# Altium PCB Zotino-DIOT.PCBDOC (part 2 of 11)
Units mil, origin at the board's own origin, x right, y up, seen from the top; angles counter-clockwise.
Board outline 8771.61 x 3949.04 mil, 4 copper layers (TopLayer, Internal Plane 2, Signal Layer 1, BottomLayer), stack 61.54 mil thick; 915 components, 534 nets, 3073 pads, 1180 vias.
Unrouted connection lines stored in the file: 36.
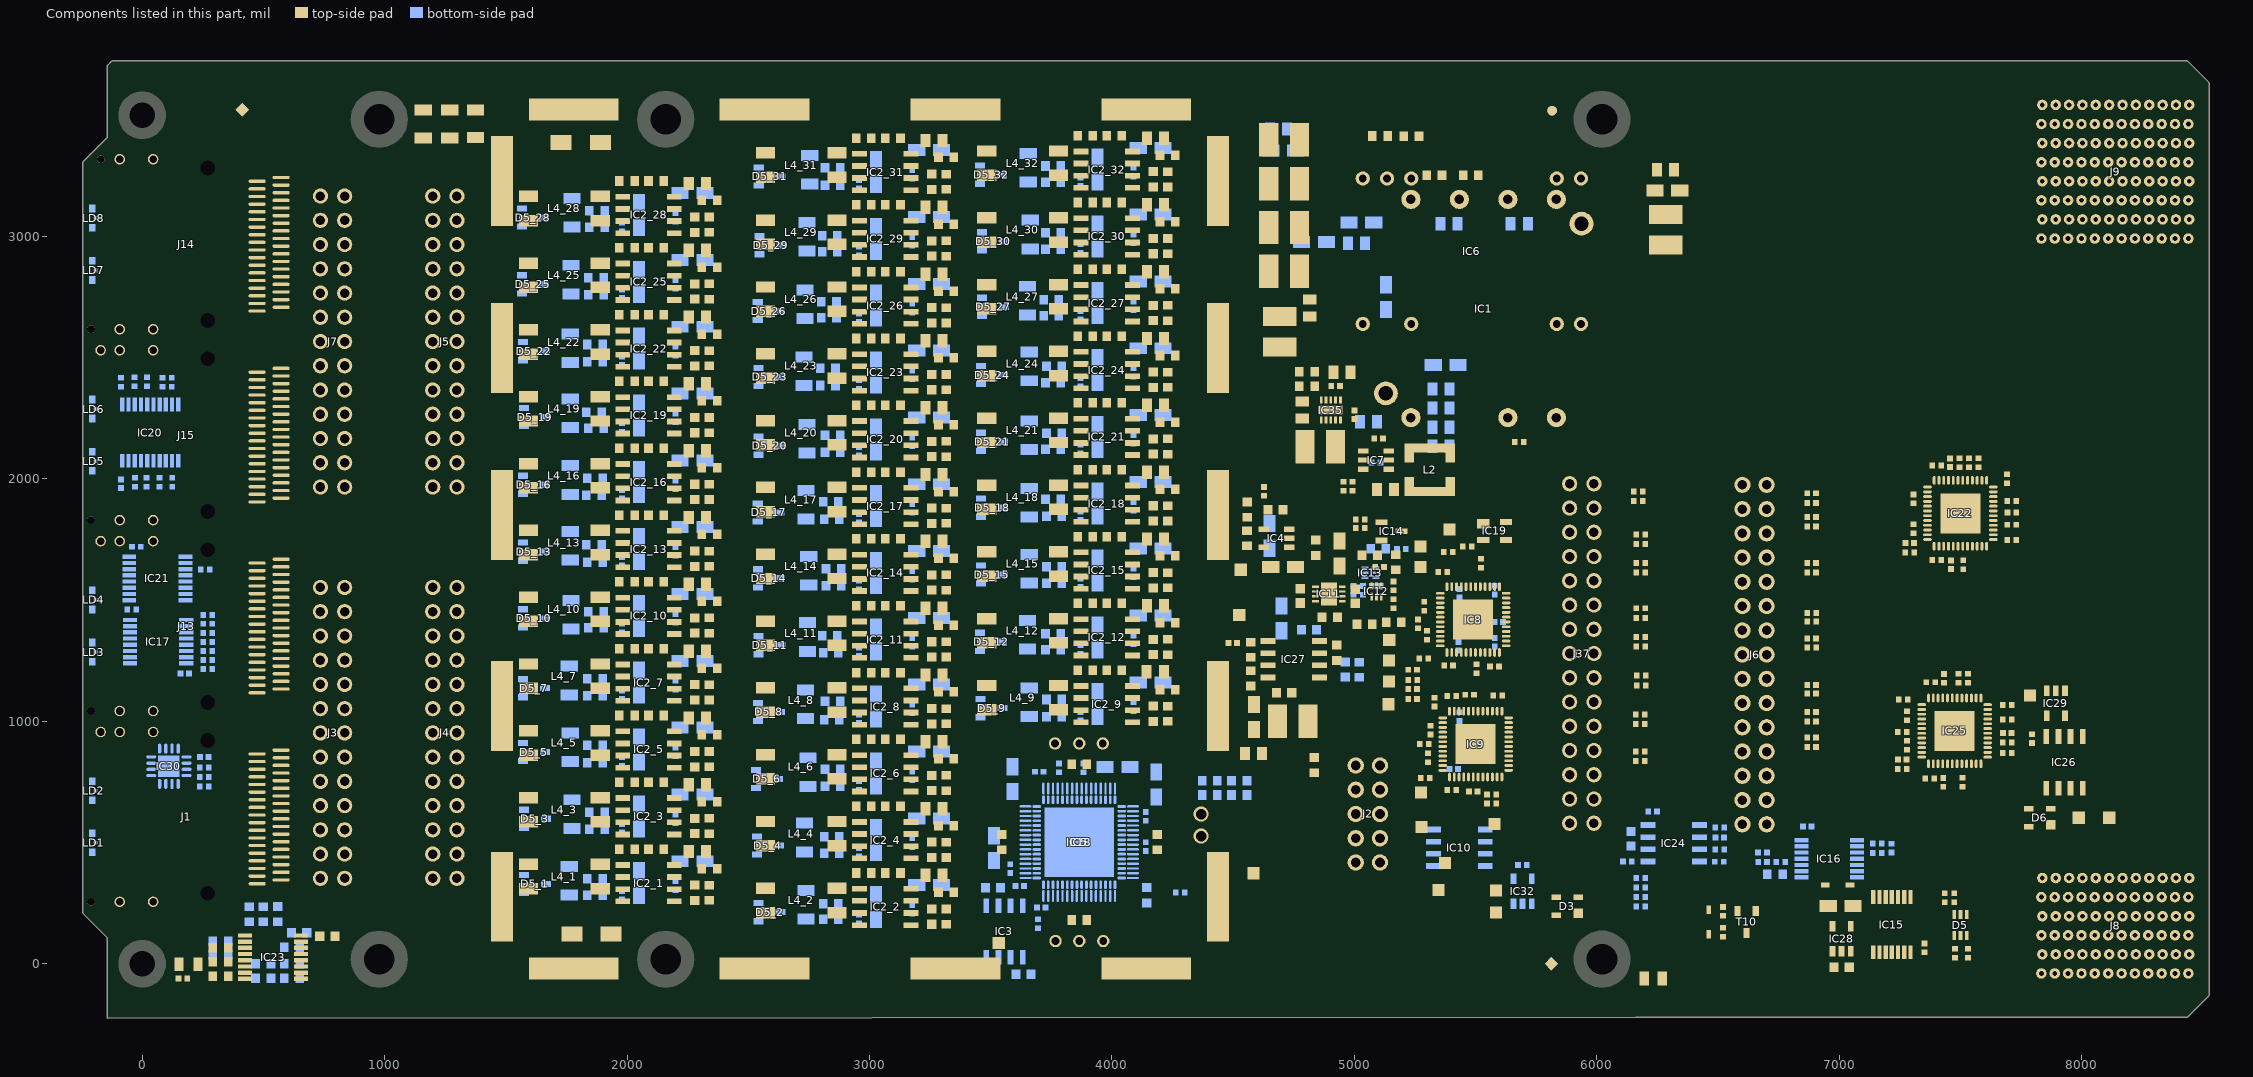
[diagram p4: the components of this part, seen from the top]

## Components (designator, comment, footprint, x,y, rotation, side; value= is the part's Value field where it differs from the comment) (continued)
C142 "22uF" CAPC2012X135N 4686.77,3443.31 r180 bottom
C144 "1uF" CAPC1608X87N 4840.32,1716.07 r90 top
C147 "10uF" CAPMP3216X180N 4650.3,1765.05 r270 bottom
C148 "100nF" CAPC1005X55N 5001.24,2264.54 r270 top
C149 "22uF" CAPC2012X135N 4784.71,2284.23 r270 top
C150 "100nF" CAPC1005X55N 4922.5,2382.65 r180 top
C151 "22uF" CAPC2012X135N 4948.58,2440.48 r180 top
CLIP28 "S1411-46R" CLIP_HOLLAND-SHIELDING_LC 4437.27,1063.76 r90 top
CLIP29 "S1411-46R" CLIP_HOLLAND-SHIELDING_LC 4437.27,1851.16 r90 top
CLIP30 "S1411-46R" CLIP_HOLLAND-SHIELDING_LC 4437.27,2540.13 r90 top
CLIP31 "S1411-46R" CLIP_HOLLAND-SHIELDING_LC 4437.27,3229.11 r90 top
CLIP32 "S1411-46R" CLIP_HOLLAND-SHIELDING_LC 3354.59,-18.92 r180 top
CLIP33 "S1411-46R" CLIP_HOLLAND-SHIELDING_LC 3354.59,3524.39 r180 top
CLIP34 "S1411-46R" CLIP_HOLLAND-SHIELDING_LC 4141.99,3524.39 r180 top
CLIP37 "S1411-46R" CLIP_HOLLAND-SHIELDING_LC 4437.27,276.35 r90 top
CLIP38 "S1411-46R" CLIP_HOLLAND-SHIELDING_LC 1484.51,3229.11 r90 top
CLIP39 "S1411-46R" CLIP_HOLLAND-SHIELDING_LC 1484.51,2540.13 r90 top
CLIP40 "S1411-46R" CLIP_HOLLAND-SHIELDING_LC 1484.51,1851.16 r90 top
CLIP41 "S1411-46R" CLIP_HOLLAND-SHIELDING_LC 1779.78,3524.39 r180 top
CLIP42 "S1411-46R" CLIP_HOLLAND-SHIELDING_LC 2567.19,3524.39 r180 top
CLIP43 "S1411-46R" CLIP_HOLLAND-SHIELDING_LC 1779.78,-18.92 r180 top
CLIP44 "S1411-46R" CLIP_HOLLAND-SHIELDING_LC 2567.19,-18.92 r180 top
CLIP45 "S1411-46R" CLIP_HOLLAND-SHIELDING_LC 4141.99,-18.92 r180 top
CLIP46 "S1411-46R" CLIP_HOLLAND-SHIELDING_LC 1484.51,276.35 r90 top
CLIP47 "S1411-46R" CLIP_HOLLAND-SHIELDING_LC 1484.51,1063.76 r90 top
D1 "SK26A" DIOM5126X265N 1808.82,3387.52 r180 top
D2 "SK26A" DIOM5126X265N 1854.06,122.96 r0 top
D3 "PRTR5V0U2X" SOT190P230X110-4N 5879,237.38 r180 top
D4 "BAT165" SOD2512X110N 6461.5,172.61 r270 top
D5 "PESD3V3L5UY" SOT65P210X110-6N 7500.35,159.77 r90 top
D5_1 "BAV199" SOT95P240X110-3N 1619.84,329.51 r0 bottom (schematic designator D5)
D5_2 "BAV199" SOT95P240X110-3N 2588.35,213.35 r0 bottom (schematic designator D5)
D5_3 "BAV199" SOT95P240X110-3N 1619.84,597.96 r0 bottom (schematic designator D5)
D5_4 "BAV199" SOT95P240X110-3N 2580.47,487.72 r0 bottom (schematic designator D5)
D5_5 "BAV199" SOT95P240X110-3N 1615.91,873.55 r0 bottom (schematic designator D5)
D5_6 "BAV199" SOT95P240X110-3N 2577.15,762.56 r0 bottom (schematic designator D5)
D5_7 "BAV199" SOT95P240X110-3N 1615.91,1137.33 r0 bottom (schematic designator D5)
D5_8 "BAV199" SOT95P240X110-3N 2584.6,1038.91 r0 bottom (schematic designator D5)
D5_9 "BAV199" SOT95P240X110-3N 3503.9,1054.65 r0 bottom (schematic designator D5)
D5_10 "BAV199" SOT95P240X110-3N 1615.91,1424.73 r0 bottom (schematic designator D5)
D5_11 "BAV199" SOT95P240X110-3N 2588.35,1314.5 r0 bottom (schematic designator D5)
D5_12 "BAV199" SOT95P240X110-3N 3501.73,1328.08 r0 bottom (schematic designator D5)
D5_13 "BAV199" SOT95P240X110-3N 1615.91,1700.32 r0 bottom (schematic designator D5)
D5_14 "BAV199" SOT95P240X110-3N 2584.6,1590.09 r0 bottom (schematic designator D5)
D5_15 "BAV199" SOT95P240X110-3N 3504.93,1605.83 r0 bottom (schematic designator D5)
D5_16 "BAV199" SOT95P240X110-3N 1615.91,1975.91 r0 bottom (schematic designator D5)
D5_17 "BAV199" SOT95P240X110-3N 2584.41,1861.74 r0 bottom (schematic designator D5)
D5_18 "BAV199" SOT95P240X110-3N 3505.67,1881.43 r0 bottom (schematic designator D5)
D5_19 "BAV199" SOT95P240X110-3N 1619.84,2255.44 r0 bottom (schematic designator D5)
D5_20 "BAV199" SOT95P240X110-3N 2588.35,2137.33 r0 bottom (schematic designator D5)
D5_21 "BAV199" SOT95P240X110-3N 3505.67,2153.08 r0 bottom (schematic designator D5)
D5_22 "BAV199" SOT95P240X110-3N 1615.91,2527.09 r0 bottom (schematic designator D5)
D5_23 "BAV199" SOT95P240X110-3N 2588.35,2420.8 r0 bottom (schematic designator D5)
D5_24 "BAV199" SOT95P240X110-3N 3505.67,2428.67 r0 bottom (schematic designator D5)
D5_25 "BAV199" SOT95P240X110-3N 1611.97,2802.68 r0 bottom (schematic designator D5)
D5_26 "BAV199" SOT95P240X110-3N 2584.41,2692.45 r0 bottom (schematic designator D5)
D5_27 "BAV199" SOT95P240X110-3N 3509.61,2709.61 r0 bottom (schematic designator D5)
D5_28 "BAV199" SOT95P240X110-3N 1611.97,3078.28 r0 bottom (schematic designator D5)
D5_29 "BAV199" SOT95P240X110-3N 2592.28,2964.1 r0 bottom (schematic designator D5)
D5_30 "BAV199" SOT95P240X110-3N 3509.61,2979.85 r0 bottom (schematic designator D5)
D5_31 "BAV199" SOT95P240X110-3N 2588.54,3247.57 r0 bottom (schematic designator D5)
D5_32 "BAV199" SOT95P240X110-3N 3501.73,3255.44 r0 bottom (schematic designator D5)
D6 "PRTR5V0U2X" SOT190P230X110-4N 7826.77,602.36 r180 top
D7 "BAT165" SOD2512X110N 6993.49,324.56 r180 top
FTG1 "Use only in PCB" FIDUCIAL_TOP_C100-200 5816,3519 r270 bottom
FTG2 "Use only in PCB" FIDUCIAL_TOP_C100-200 5816,3519 r270 top
FTG3 "Use only in PCB" FIDUCIAL_TOP_S100-200 413,3523.16 r270 bottom
FTG4 "Use only in PCB" FIDUCIAL_TOP_S100-200 5813,0.6 r270 bottom
FTG5 "Use only in PCB" FIDUCIAL_TOP_S100-200 5813,0.6 r270 top
FTG6 "Use only in PCB" FIDUCIAL_TOP_S100-200 413,3523.16 r270 top
HS1 "Heat Sink No Pad" HSINK_ATS_ATS-56001-C3-R0 3865.21,501.5 r180 top locked
IC1 "CC6-1212DF-E" CC6-1212DF-E 5130,2353 r90 top locked
IC2_1 "OPA197ID" SOIC127P600X175-8N 2088.6,333 r180 top (schematic designator IC2)
IC2_2 "OPA197ID" SOIC127P600X175-8N 3064.98,234.57 r180 top (schematic designator IC2)
IC2_3 "OPA197ID" SOIC127P600X175-8N 2088.6,608.59 r180 top (schematic designator IC2)
IC2_4 "OPA197ID" SOIC127P600X175-8N 3064.98,510.17 r180 top (schematic designator IC2)
IC2_5 "OPA197ID" SOIC127P600X175-8N 2088.6,884.18 r180 top (schematic designator IC2)
IC2_6 "OPA197ID" SOIC127P600X175-8N 3064.98,785.76 r180 top (schematic designator IC2)
IC2_7 "OPA197ID" SOIC127P600X175-8N 2088.6,1159.77 r180 top (schematic designator IC2)
IC2_8 "OPA197ID" SOIC127P600X175-8N 3064.98,1061.35 r180 top (schematic designator IC2)
IC2_9 "OPA197ID" SOIC127P600X175-8N 3978.37,1071.19 r180 top (schematic designator IC2)
IC2_10 "OPA197ID" SOIC127P600X175-8N 2088.6,1435.36 r180 top (schematic designator IC2)
IC2_11 "OPA197ID" SOIC127P600X175-8N 3064.98,1336.94 r180 top (schematic designator IC2)
IC2_12 "OPA197ID" SOIC127P600X175-8N 3978.37,1346.78 r180 top (schematic designator IC2)
IC2_13 "OPA197ID" SOIC127P600X175-8N 2088.6,1710.95 r180 top (schematic designator IC2)
IC2_14 "OPA197ID" SOIC127P600X175-8N 3064.98,1612.53 r180 top (schematic designator IC2)
IC2_15 "OPA197ID" SOIC127P600X175-8N 3978.37,1622.37 r180 top (schematic designator IC2)
IC2_16 "OPA197ID" SOIC127P600X175-8N 2088.6,1986.54 r180 top (schematic designator IC2)
IC2_17 "OPA197ID" SOIC127P600X175-8N 3064.98,1888.12 r180 top (schematic designator IC2)
IC2_18 "OPA197ID" SOIC127P600X175-8N 3978.37,1897.96 r180 top (schematic designator IC2)
IC2_19 "OPA197ID" SOIC127P600X175-8N 2088.6,2262.13 r180 top (schematic designator IC2)
IC2_20 "OPA197ID" SOIC127P600X175-8N 3064.98,2163.71 r180 top (schematic designator IC2)
IC2_21 "OPA197ID" SOIC127P600X175-8N 3978.37,2173.55 r180 top (schematic designator IC2)
IC2_22 "OPA197ID" SOIC127P600X175-8N 2088.6,2537.72 r180 top (schematic designator IC2)
IC2_23 "OPA197ID" SOIC127P600X175-8N 3064.98,2439.3 r180 top (schematic designator IC2)
IC2_24 "OPA197ID" SOIC127P600X175-8N 3978.37,2449.14 r180 top (schematic designator IC2)
IC2_25 "OPA197ID" SOIC127P600X175-8N 2088.6,2813.32 r180 top (schematic designator IC2)
IC2_26 "OPA197ID" SOIC127P600X175-8N 3064.98,2714.89 r180 top (schematic designator IC2)
IC2_27 "OPA197ID" SOIC127P600X175-8N 3978.37,2724.73 r180 top (schematic designator IC2)
IC2_28 "OPA197ID" SOIC127P600X175-8N 2088.6,3088.91 r180 top (schematic designator IC2)
IC2_29 "OPA197ID" SOIC127P600X175-8N 3064.98,2990.48 r180 top (schematic designator IC2)
IC2_30 "OPA197ID" SOIC127P600X175-8N 3978.37,3000.32 r180 top (schematic designator IC2)
IC2_31 "OPA197ID" SOIC127P600X175-8N 3064.98,3266.07 r180 top (schematic designator IC2)
IC2_32 "OPA197ID" SOIC127P600X175-8N 3978.37,3275.91 r180 top (schematic designator IC2)
IC3 "MAX6250ACSA+" SOIC127P600X175-8N 3556.85,133.39 r90 bottom
IC4 "LT1964ES5-BYP#TRMPBF" SOT95P280X100-5N 4678.9,1755.44 r180 top
IC5 "AD5373BSTZ" TSQFP50P1200X1200X160-64L 3865.21,501.5 r90 bottom locked
IC6 "JHM0612D12" DCDC_XPPOWER_JHM0X 5480,2939.25 r180 top locked
IC7 "AP62201WU-7" SOT95P280X100-6N 5089.37,2077.68 r180 top
IC8 "SN65MLVD040RGZT" QFN50P700X700X100-49N-S420 5490.15,1420.02 r0 top
IC9 "SN65MLVD040RGZT" QFN50P700X700X100-49N-S420 5500.55,906.37 r0 top
IC10 "24AA02E48-I/SN" SOIC127P600X175-8N 5433.31,478.87 r0 bottom
IC11 "LT1964EDD#PBF" LT-DD-8_V 4895.02,1525.79 r0 top
IC12 "TPS389001DSET" TPS610985DSET 5091.24,1536.28 r0 top
IC13 "TPS389001DSET" TPS610985DSET 5066.14,1612.96 r270 bottom
IC14 "LM4040CIM3-5.0" SOT95P237X112-3N 5153.79,1783.69 r0 top
IC15 "74HC4066PW" SOP65P640X110-14N 7217.12,161.54 r270 top
IC16 "74HC4066PW" SOP65P640X110-14N 6959.16,433.37 r180 bottom
IC17 "74LVC138APW" SOP65P640X110-16N 65.94,1328.74 r0 bottom
IC18 "AD5372BCPZ" QFN50P900X900X100-65N-S725 3865.21,501.5 r90 bottom locked
IC19 "STM811SW16F" SOT143N 5578.51,1785.39 r0 top
IC20 "74LVC244APWR" SOP65P640X110-20N 33.46,2190.94 r270 bottom
IC21 "74HC4051PW" SOP65P640X120-16N 62.99,1589.57 r180 bottom
IC22 "SN65MLVD040RGZT" QFN50P700X700X100-49N-S420 7500,1858.27 r0 top
IC23 "SN74LV595APWT" SOP65P640X120-16N 539.63,27.34 r0 top
IC24 "TLC555ID" SOIC127P600X175-8N 6317.47,497.31 r180 bottom
IC25 "SN65MLVD040RGZT" QFN50P700X700X100-49N-S420 7476.38,960.63 r0 top
IC26 "24AA02E48-I/SN" SOIC127P600X175-8N 7929.13,830.71 r90 top
IC27 "LT1763CS8#PBF" SOIC127P600X175-8N 4749.62,1256.11 r0 top
IC28 "MIC5219-3.3YM5" SOT95P280X145-5N 7009.92,102.72 r90 top
IC29 "24AA02E48T-I/OT" SOT95P280X145-5N 7893.7,1074.8 r270 top
IC30 "PCA9534RGVR" QFN65P400X400X100-17N-S225 110.24,814.96 r90 bottom
IC32 "24AA02E48T-I/OT" SOT95P280X145-5N 5694,299 r90 bottom
IC35 "TPS62175DQC" SON50P200X300X80-11N-R94X250 4902.82,2284.23 r270 top
J1 "iPass™" MOLEX_75783-0107#1 523.58,605.84 r270 top
J2 "Header 10" 3M_N2510-6002RB 5055.79,617.96 r270 top locked
J3 "Header 26" 3M_N2526-6002RB 785.2,952.54 r90 top
J4 "Header 26" 3M_N2526-6002RB 1248.29,952.54 r90 top
J5 "Header 26" 3M_N2526-6002RB 1248.29,2566.71 r90 top
J6 "" 3M_N2530-6002RB#1 6650.78,1275.59 r270 top
J7 "Header 26" 3M_N2526-6002RB 785.2,2566.71 r90 top
J8 "P1" AMPHENOL_10052825-101LF 8139.08,157.02 r90 top
J9 "P6" AMPHENOL_10052838-101LF 8139.09,3267.25 r90 top
J13 "iPass™" MOLEX_75783-0107#1 523.58,1393.24 r270 top
J14 "iPass™" MOLEX_75783-0107#2 523.58,2968.04 r270 top
J15 "iPass™" MOLEX_75783-0107#1 523.58,2180.64 r270 top
J37 "" 3M_N2530-6002RB#2 5938.23,1279.89 r270 top locked
L1 "10uH" IND_MURATA-PS_8400 4746.47,1000.9 r180 top
L2 "3.3uH" IND_WURTH_WE-TPC_4828 5311.37,2037.68 r270 top
L3 "10uH" IND_MURATA-PS_8400 6284.45,3027.56 r90 top
L4_1 "2x6.5mH" IND_WURTH_WE-SL2 1741.71,359.81 r180 top (schematic designator L4)
L4_2 "2x6.5mH" IND_WURTH_WE-SL2 2718.09,261.38 r180 top (schematic designator L4)
L4_3 "2x6.5mH" IND_WURTH_WE-SL2 1741.71,635.4 r180 top (schematic designator L4)
L4_4 "2x6.5mH" IND_WURTH_WE-SL2 2718.09,536.97 r180 top (schematic designator L4)
L4_5 "2x6.5mH" IND_WURTH_WE-SL2 1741.71,910.99 r180 top (schematic designator L4)
L4_6 "2x6.5mH" IND_WURTH_WE-SL2 2718.09,812.56 r180 top (schematic designator L4)
L4_7 "2x6.5mH" IND_WURTH_WE-SL2 1741.71,1186.58 r180 top (schematic designator L4)
L4_8 "2x6.5mH" IND_WURTH_WE-SL2 2718.09,1088.15 r180 top (schematic designator L4)
L4_9 "2x6.5mH" IND_WURTH_WE-SL2 3631.48,1097.99 r180 top (schematic designator L4)
L4_10 "2x6.5mH" IND_WURTH_WE-SL2 1741.71,1462.17 r180 top (schematic designator L4)
L4_11 "2x6.5mH" IND_WURTH_WE-SL2 2718.09,1363.74 r180 top (schematic designator L4)
L4_12 "2x6.5mH" IND_WURTH_WE-SL2 3631.48,1373.58 r180 top (schematic designator L4)
L4_13 "2x6.5mH" IND_WURTH_WE-SL2 1741.71,1737.76 r180 top (schematic designator L4)
L4_14 "2x6.5mH" IND_WURTH_WE-SL2 2718.09,1639.33 r180 top (schematic designator L4)
L4_15 "2x6.5mH" IND_WURTH_WE-SL2 3631.48,1649.18 r180 top (schematic designator L4)
L4_16 "2x6.5mH" IND_WURTH_WE-SL2 1741.71,2013.35 r180 top (schematic designator L4)
L4_17 "2x6.5mH" IND_WURTH_WE-SL2 2718.09,1914.92 r180 top (schematic designator L4)
L4_18 "2x6.5mH" IND_WURTH_WE-SL2 3631.48,1924.77 r180 top (schematic designator L4)
L4_19 "2x6.5mH" IND_WURTH_WE-SL2 1741.71,2288.94 r180 top (schematic designator L4)
L4_20 "2x6.5mH" IND_WURTH_WE-SL2 2718.09,2190.51 r180 top (schematic designator L4)
L4_21 "2x6.5mH" IND_WURTH_WE-SL2 3631.48,2200.36 r180 top (schematic designator L4)
L4_22 "2x6.5mH" IND_WURTH_WE-SL2 1741.71,2564.53 r180 top (schematic designator L4)
L4_23 "2x6.5mH" IND_WURTH_WE-SL2 2718.09,2466.1 r180 top (schematic designator L4)
L4_24 "2x6.5mH" IND_WURTH_WE-SL2 3631.48,2475.95 r180 top (schematic designator L4)
L4_25 "2x6.5mH" IND_WURTH_WE-SL2 1741.71,2840.12 r180 top (schematic designator L4)
L4_26 "2x6.5mH" IND_WURTH_WE-SL2 2718.09,2741.69 r180 top (schematic designator L4)
L4_27 "2x6.5mH" IND_WURTH_WE-SL2 3631.48,2751.54 r180 top (schematic designator L4)
L4_28 "2x6.5mH" IND_WURTH_WE-SL2 1741.71,3115.71 r180 top (schematic designator L4)
L4_29 "2x6.5mH" IND_WURTH_WE-SL2 2718.09,3017.28 r180 top (schematic designator L4)
L4_30 "2x6.5mH" IND_WURTH_WE-SL2 3631.48,3027.13 r180 top (schematic designator L4)
L4_31 "2x6.5mH" IND_WURTH_WE-SL2 2718.27,3294.81 r180 top (schematic designator L4)
L4_32 "2x6.5mH" IND_WURTH_WE-SL2 3631.48,3302.72 r180 top (schematic designator L4)
L6 "10uH" IND_MURATA-PS_8400 4710.13,3037.29 r180 top
L7 "10uH" IND_MURATA-PS_8400 4710.13,2856.29 r0 top
L8 "10uH" IND_MURATA-PS_8400 4692.3,2607.8 r90 top
L9 "10uH" IND_MURATA-PS_8400 4710.13,3399.29 r180 top
L15 "10uH" IND_MURATA-PS_8400 4710.13,3218.29 r0 top
L16 "10uH" IND_MURATA-PS_8400 4858.84,2132.89 r180 top
LD1 "Green" LED_AVAGO_HSME-C120 -206,499.19 r270 bottom
LD2 "Green" LED_AVAGO_HSME-C120 -206,714.19 r270 bottom
LD3 "Green" LED_AVAGO_HSME-C120 -206,1285.75 r270 bottom
LD4 "Green" LED_AVAGO_HSME-C120 -206,1501.1 r270 bottom
LD5 "Green" LED_AVAGO_HSME-C120 -206,2073.15 r270 bottom
LD6 "Green" LED_AVAGO_HSME-C120 -206,2288.5 r270 bottom
LD7 "Green" LED_AVAGO_HSME-C120 -206,2860.19 r270 bottom
LD8 "Green" LED_AVAGO_HSME-C120 -206,3076.06 r270 bottom
R1 "Undefined" RESC1608X55N 5330,3253 r180 top
R2 "0" RESC1005X40N 5680,2153 r180 top
R3 "0" RESC1005X40N 3694.65,164.89 r270 bottom
R4 "36k" RESC1608X55N 5480,3253 r180 top
R5_1 "1k" RESC1608X55N 1867.87,283 r180 bottom (schematic designator R5)
R5_2 "1k" RESC1608X55N 2840.31,184.57 r180 bottom (schematic designator R5)
R5_3 "1k" RESC1608X55N 1875.75,625.52 r180 bottom (schematic designator R5)
R5_4 "1k" RESC1608X55N 2844.25,523.16 r180 bottom (schematic designator R5)
R5_5 "1k" RESC1608X55N 1867.87,901.11 r180 bottom (schematic designator R5)
R5_6 "1k" RESC1608X55N 2848.19,802.69 r180 bottom (schematic designator R5)
R5_7 "1k" RESC1608X55N 1867.87,1176.7 r180 bottom (schematic designator R5)
R5_8 "1k" RESC1608X55N 2848.19,1082.21 r180 bottom (schematic designator R5)
R5_9 "1k" RESC1608X55N 3761.57,1090.15 r180 bottom (schematic designator R5)
R5_10 "1k" RESC1608X55N 1871.81,1452.29 r180 bottom (schematic designator R5)
R5_11 "1k" RESC1608X55N 2836.38,1353.87 r180 bottom (schematic designator R5)
R5_12 "1k" RESC1608X55N 3757.64,1361.74 r180 bottom (schematic designator R5)
R5_13 "1k" RESC1608X55N 1863.94,1727.88 r180 bottom (schematic designator R5)
R5_14 "1k" RESC1608X55N 2852.13,1629.46 r180 bottom (schematic designator R5)
R5_15 "1k" RESC1608X55N 3761.57,1637.33 r180 bottom (schematic designator R5)
R5_16 "1k" RESC1608X55N 1867.87,2003.47 r180 bottom (schematic designator R5)
R5_17 "1k" RESC1608X55N 2840.31,1905.05 r180 bottom (schematic designator R5)
R5_18 "1k" RESC1608X55N 3761.57,1845.99 r180 bottom (schematic designator R5)
R5_19 "1k" RESC1608X55N 1871.81,2208.2 r180 bottom (schematic designator R5)
R5_20 "1k" RESC1608X55N 2848.19,2180.64 r180 bottom (schematic designator R5)
R5_21 "1k" RESC1608X55N 3761.57,2188.51 r180 bottom (schematic designator R5)
R5_22 "1k" RESC1608X55N 1867.87,2554.65 r180 bottom (schematic designator R5)
R5_23 "1k" RESC1608X55N 2828.5,2456.23 r180 bottom (schematic designator R5)
R5_24 "1k" RESC1608X55N 3761.57,2464.1 r180 bottom (schematic designator R5)
R5_25 "1k" RESC1608X55N 1871.81,2830.24 r180 bottom (schematic designator R5)
R5_26 "1k" RESC1608X55N 2832.44,2731.82 r180 bottom (schematic designator R5)
R5_27 "1k" RESC1608X55N 3749.76,2739.69 r180 bottom (schematic designator R5)
R5_28 "1k" RESC1608X55N 1875.75,3105.83 r180 bottom (schematic designator R5)
R5_29 "1k" RESC1608X55N 2836.38,3003.47 r180 bottom (schematic designator R5)
R5_30 "1k" RESC1608X55N 3757.64,3015.28 r180 bottom (schematic designator R5)
R5_31 "1k" RESC1608X55N 2848.19,3283 r180 bottom (schematic designator R5)
R5_32 "1k" RESC1608X55N 3757.64,3290.87 r180 bottom (schematic designator R5)
R6 "100" RESC1005X40N 5578.15,1226.89 r0 top
R7_1 "1k" RESC1608X55N 1867.87,349.93 r180 bottom (schematic designator R7)
R7_2 "1k" RESC1608X55N 2840.31,247.57 r180 bottom (schematic designator R7)
R7_3 "1k" RESC1608X55N 1875.75,554.65 r180 bottom (schematic designator R7)
R7_4 "1k" RESC1608X55N 2844.25,456.23 r180 bottom (schematic designator R7)
R7_5 "1k" RESC1608X55N 1867.87,830.24 r180 bottom (schematic designator R7)
R7_6 "1k" RESC1608X55N 2848.19,731.82 r180 bottom (schematic designator R7)
R7_7 "1k" RESC1608X55N 1867.87,1105.83 r180 bottom (schematic designator R7)
R7_8 "1k" RESC1608X55N 2844.25,1007.41 r180 bottom (schematic designator R7)
R7_9 "1k" RESC1608X55N 3761.57,1019.22 r180 bottom (schematic designator R7)
R7_10 "1k" RESC1608X55N 1871.81,1385.36 r180 bottom (schematic designator R7)
R7_11 "1k" RESC1608X55N 2840.31,1283 r180 bottom (schematic designator R7)
R7_12 "1k" RESC1608X55N 3757.64,1294.81 r180 bottom (schematic designator R7)
R7_13 "1k" RESC1608X55N 1867.87,1657.02 r180 bottom (schematic designator R7)
R7_14 "1k" RESC1608X55N 2852.13,1558.59 r180 bottom (schematic designator R7)
R7_15 "1k" RESC1608X55N 3761.57,1570.4 r180 bottom (schematic designator R7)
R7_16 "1k" RESC1608X55N 1863.94,1932.61 r180 bottom (schematic designator R7)
R7_17 "1k" RESC1608X55N 2844.25,1834.18 r180 bottom (schematic designator R7)
R7_18 "1k" RESC1608X55N 3757.64,1916.86 r180 bottom (schematic designator R7)
R7_19 "1k" RESC1608X55N 1863.94,2275.13 r180 bottom (schematic designator R7)
R7_20 "1k" RESC1608X55N 2848.19,2109.77 r180 bottom (schematic designator R7)
R7_21 "1k" RESC1608X55N 3757.64,2121.58 r180 bottom (schematic designator R7)
R7_22 "1k" RESC1608X55N 1867.87,2483.79 r180 bottom (schematic designator R7)
R7_23 "1k" RESC1608X55N 2828.5,2385.36 r180 bottom (schematic designator R7)
R7_24 "1k" RESC1608X55N 3757.64,2397.17 r180 bottom (schematic designator R7)
R7_25 "1k" RESC1608X55N 1871.81,2759.38 r180 bottom (schematic designator R7)
R7_26 "1k" RESC1608X55N 2832.44,2664.89 r180 bottom (schematic designator R7)
R7_27 "1k" RESC1608X55N 3749.76,2672.76 r180 bottom (schematic designator R7)
R7_28 "1k" RESC1608X55N 1875.75,3038.91 r180 bottom (schematic designator R7)
R7_29 "1k" RESC1608X55N 2836.38,2936.54 r180 bottom (schematic designator R7)
R7_30 "1k" RESC1608X55N 3757.64,2948.35 r180 bottom (schematic designator R7)
R7_31 "1k" RESC1608X55N 2848.19,3212.13 r180 bottom (schematic designator R7)
R7_32 "1k" RESC1608X55N 3757.64,3223.94 r180 bottom (schematic designator R7)
R8 "220" RESC1608X55N 3865.38,180.64 r0 top
R9 "220" RESC1608X55N 3545.04,501.85 r90 top
R10 "220" RESC1608X55N 3865.38,822.37 r0 top
R11 "0" RESC1005X40N 5388.15,1698.89 r0 top
R12 "220" RESC1608X55N 4186.77,501.85 r270 top
R13 "0" RESC1005X40N 5465.48,1721.98 r0 top
R14 "0" RESC1005X40N 5241.15,1169.89 r0 top
R15 "Undefined" RESC1608X55N 4833.97,819.55 r90 top
R16 "100" RESC1005X40N 5522.46,1652.8 r270 top
R17 "100" RESC1005X40N 5262.73,1401.76 r90 top
R18 "100" RESC1005X40N 5503.15,1216.89 r90 top
R19 "100" RESC1005X40N 5285.46,1258.8 r0 top
R20 "100" RESC1005X40N 5331.15,1079.89 r270 top
R21 "100" RESC1005X40N 5475.15,1109.89 r0 top
R22 "100" RESC1005X40N 5288.15,905.89 r0 top
R23 "100" RESC1005X40N 5547.46,679.8 r90 top
R24_1 "2k32" RESC1608X55N 2340,393 r180 top (schematic designator R24)
R24_2 "2k32" RESC1608X55N 3316.38,294.57 r180 top (schematic designator R24)
R24_3 "2k32" RESC1608X55N 2340,668.59 r180 top (schematic designator R24)
R24_4 "2k32" RESC1608X55N 3316.38,570.17 r180 top (schematic designator R24)
R24_5 "2k32" RESC1608X55N 2340,944.18 r180 top (schematic designator R24)
R24_6 "2k32" RESC1608X55N 3316.38,845.76 r180 top (schematic designator R24)
R24_7 "2k32" RESC1608X55N 2340,1219.77 r180 top (schematic designator R24)
R24_8 "2k32" RESC1608X55N 3316.38,1121.35 r180 top (schematic designator R24)
R24_9 "2k32" RESC1608X55N 4229.76,1131.19 r180 top (schematic designator R24)
R24_10 "2k32" RESC1608X55N 2340,1495.36 r180 top (schematic designator R24)
R24_11 "2k32" RESC1608X55N 3316.38,1396.94 r180 top (schematic designator R24)
R24_12 "2k32" RESC1608X55N 4229.76,1406.78 r180 top (schematic designator R24)
R24_13 "2k32" RESC1608X55N 2340,1770.95 r180 top (schematic designator R24)
R24_14 "2k32" RESC1608X55N 3316.38,1672.53 r180 top (schematic designator R24)
R24_15 "2k32" RESC1608X55N 4229.76,1682.37 r180 top (schematic designator R24)
R24_16 "2k32" RESC1608X55N 2340,2046.54 r180 top (schematic designator R24)
R24_17 "2k32" RESC1608X55N 3316.38,1948.12 r180 top (schematic designator R24)
R24_18 "2k32" RESC1608X55N 4229.76,1957.96 r180 top (schematic designator R24)
R24_19 "2k32" RESC1608X55N 2340,2322.13 r180 top (schematic designator R24)
R24_20 "2k32" RESC1608X55N 3316.38,2223.71 r180 top (schematic designator R24)
R24_21 "2k32" RESC1608X55N 4229.76,2233.55 r180 top (schematic designator R24)
R24_22 "2k32" RESC1608X55N 2340,2597.72 r180 top (schematic designator R24)
R24_23 "2k32" RESC1608X55N 3316.38,2499.3 r180 top (schematic designator R24)
R24_24 "2k32" RESC1608X55N 4229.76,2509.14 r180 top (schematic designator R24)
R24_25 "2k32" RESC1608X55N 2340,2873.32 r180 top (schematic designator R24)
R24_26 "2k32" RESC1608X55N 3316.38,2774.89 r180 top (schematic designator R24)
R24_27 "2k32" RESC1608X55N 4229.76,2784.73 r180 top (schematic designator R24)
R24_28 "2k32" RESC1608X55N 2340,3148.91 r180 top (schematic designator R24)
R24_29 "2k32" RESC1608X55N 3316.38,3050.48 r180 top (schematic designator R24)
R24_30 "2k32" RESC1608X55N 4229.76,3060.32 r180 top (schematic designator R24)
R24_31 "2k32" RESC1608X55N 3316.38,3326.07 r180 top (schematic designator R24)
R24_32 "2k32" RESC1608X55N 4229.76,3335.91 r180 top (schematic designator R24)
R25_1 "9k09" RESC1608X55N 2340,293 r270 top (schematic designator R25)
R25_2 "9k09" RESC1608X55N 3316.38,194.57 r270 top (schematic designator R25)
R25_3 "9k09" RESC1608X55N 2340,568.59 r270 top (schematic designator R25)
R25_4 "9k09" RESC1608X55N 3316.38,470.17 r270 top (schematic designator R25)
R25_5 "9k09" RESC1608X55N 2340,844.18 r270 top (schematic designator R25)
R25_6 "9k09" RESC1608X55N 3316.38,745.76 r270 top (schematic designator R25)
R25_7 "9k09" RESC1608X55N 2340,1119.77 r270 top (schematic designator R25)
R25_8 "9k09" RESC1608X55N 3316.38,1021.35 r270 top (schematic designator R25)
R25_9 "9k09" RESC1608X55N 4229.76,1031.19 r270 top (schematic designator R25)
R25_10 "9k09" RESC1608X55N 2340,1395.36 r270 top (schematic designator R25)
R25_11 "9k09" RESC1608X55N 3316.38,1296.94 r270 top (schematic designator R25)
R25_12 "9k09" RESC1608X55N 4229.76,1306.78 r270 top (schematic designator R25)
R25_13 "9k09" RESC1608X55N 2340,1670.95 r270 top (schematic designator R25)
R25_14 "9k09" RESC1608X55N 3316.38,1572.53 r270 top (schematic designator R25)
R25_15 "9k09" RESC1608X55N 4229.76,1582.37 r270 top (schematic designator R25)
R25_16 "9k09" RESC1608X55N 2340,1946.54 r270 top (schematic designator R25)
R25_17 "9k09" RESC1608X55N 3316.38,1848.12 r270 top (schematic designator R25)
R25_18 "9k09" RESC1608X55N 4229.76,1857.96 r270 top (schematic designator R25)
R25_19 "9k09" RESC1608X55N 2340,2222.13 r270 top (schematic designator R25)
R25_20 "9k09" RESC1608X55N 3316.38,2123.71 r270 top (schematic designator R25)
R25_21 "9k09" RESC1608X55N 4229.76,2133.55 r270 top (schematic designator R25)
R25_22 "9k09" RESC1608X55N 2340,2497.72 r270 top (schematic designator R25)
R25_23 "9k09" RESC1608X55N 3316.38,2399.3 r270 top (schematic designator R25)
R25_24 "9k09" RESC1608X55N 4229.76,2409.14 r270 top (schematic designator R25)
R25_25 "9k09" RESC1608X55N 2340,2773.32 r270 top (schematic designator R25)
R25_26 "9k09" RESC1608X55N 3316.38,2674.89 r270 top (schematic designator R25)
R25_27 "9k09" RESC1608X55N 4229.76,2684.73 r270 top (schematic designator R25)
R25_28 "9k09" RESC1608X55N 2340,3048.91 r270 top (schematic designator R25)
R25_29 "9k09" RESC1608X55N 3316.38,2950.48 r270 top (schematic designator R25)
R25_30 "9k09" RESC1608X55N 4229.77,2960.32 r270 top (schematic designator R25)
R25_31 "9k09" RESC1608X55N 3316.38,3226.07 r270 top (schematic designator R25)
R25_32 "9k09" RESC1608X55N 4229.76,3235.91 r270 top (schematic designator R25)
R26 "Undefined" RESC1608X55N 5235.29,3414.15 r0 top
R27 "12k7" RESC1608X55N 5105.77,3414.64 r0 top
R28 "33" RESC1005X40N 270.67,1215.55 r0 bottom
R29 "33" RESC1005X40N 270.67,1252.95 r0 bottom
R30 "Undefined" RESC3216X65N 1374.27,3465.33 r270 top
R31 "Undefined" RESC3216X65N 1268.84,3464.1 r270 top
R32 "Undefined" RESC3216X65N 1159.21,3464.1 r270 top
R33 "31k6" RESC1005X35N 4954.49,1969.68 r270 top
R34 "10k" RESC1005X40N 4991.89,1970.11 r90 top
R35 "24k" RESC1608X55N 5171.67,1656.42 r90 top
R36 "10k" RESC1005X40N 5023.94,1798.27 r180 top
R37 "0" RESC1005X40N 5162.09,1485.02 r90 top
R38 "10k" RESC1005X40N 5194.47,1711.62 r0 bottom
R39 "24k" RESC1608X55N 5021.13,1212.85 r270 bottom
R40 "1k" RESC1608X55N 5098.56,1712.58 r0 bottom
R41 "0" RESC1005X40N 5090.72,1558.18 r180 bottom
R42 "0" RESC1005X40N 5023.94,1833.49 r0 top
R43 "24k" RESC1608X55N 5042.65,1401.51 r180 top
R44 "2k7" RESC1608X55N 5162.73,1409.61 r180 top
R45 "0" RESC1005X40N 7477.42,43.6 r270 top
R46 "0" RESC1005X40N 7530.47,42.93 r270 top
R47 "0" RESC1005X40N 6171.26,1948.82 r180 top
R48 "0" RESC1005X40N 6181.1,1732.28 r180 top
R49 "0" RESC1005X40N 6181.1,1653.54 r180 top
R50 "0" RESC1005X40N 6181.1,1427.17 r180 top
R51 "0" RESC1005X40N 4281.26,294.81 r0 bottom
R52 "0" RESC1005X40N 6181.1,1348.43 r180 top
R53 "0" RESC1005X40N 6183.24,1189.15 r180 top
R54 "0" RESC1005X40N 6179.71,1028.06 r180 top
R55 "0" RESC1005X40N 6179.87,874.94 r180 top
R56 "0" RESC1005X40N 6171.26,1909.45 r180 top
R57 "0" RESC1005X40N 6181.1,1771.65 r180 top
R58 "220" RESC1608X55N 617.87,68.43 r0 bottom
R59 "0" RESC1005X40N 6181.1,1614.17 r180 top
R60 "0" RESC1005X40N 6181.1,1466.54 r180 top
R61 "0" RESC1005X40N 6181.1,1309.06 r180 top
R62 "0" RESC1005X40N 6183.93,1147.76 r180 top
R63 "0" RESC1005X40N 6179.41,989.54 r180 top
R64 "0" RESC1005X40N 6179.72,836.33 r180 top
R65 "0" RESC1005X40N 6181.1,236.22 r180 bottom
R66 "0" RESC1005X40N 6181.1,275.59 r180 bottom
R67_1 "11k" RESC1608X55N 2000,473 r180 top (schematic designator R67)
R67_2 "11k" RESC1608X55N 2976.38,374.57 r180 top (schematic designator R67)
R67_3 "11k" RESC1608X55N 2000,748.59 r180 top (schematic designator R67)
R67_4 "11k" RESC1608X55N 2976.38,650.17 r180 top (schematic designator R67)
R67_5 "11k" RESC1608X55N 2000,1024.18 r180 top (schematic designator R67)
R67_6 "11k" RESC1608X55N 2976.38,925.76 r180 top (schematic designator R67)
R67_7 "11k" RESC1608X55N 2000,1299.77 r180 top (schematic designator R67)
R67_8 "11k" RESC1608X55N 2976.38,1201.35 r180 top (schematic designator R67)
R67_9 "11k" RESC1608X55N 3889.76,1211.19 r180 top (schematic designator R67)
R67_10 "11k" RESC1608X55N 2000,1575.36 r180 top (schematic designator R67)
R67_11 "11k" RESC1608X55N 2976.38,1476.94 r180 top (schematic designator R67)
R67_12 "11k" RESC1608X55N 3889.76,1486.78 r180 top (schematic designator R67)
R67_13 "11k" RESC1608X55N 2000,1850.95 r180 top (schematic designator R67)
R67_14 "11k" RESC1608X55N 2976.38,1752.53 r180 top (schematic designator R67)
R67_15 "11k" RESC1608X55N 3889.76,1762.37 r180 top (schematic designator R67)
R67_16 "11k" RESC1608X55N 2000,2126.54 r180 top (schematic designator R67)
R67_17 "11k" RESC1608X55N 2976.38,2028.12 r180 top (schematic designator R67)
R67_18 "11k" RESC1608X55N 3889.76,2037.96 r180 top (schematic designator R67)
R67_19 "11k" RESC1608X55N 2000,2402.13 r180 top (schematic designator R67)
R67_20 "11k" RESC1608X55N 2976.38,2303.71 r180 top (schematic designator R67)
R67_21 "11k" RESC1608X55N 3889.76,2313.55 r180 top (schematic designator R67)
R67_22 "11k" RESC1608X55N 2000,2677.72 r180 top (schematic designator R67)
R67_23 "11k" RESC1608X55N 2976.38,2579.3 r180 top (schematic designator R67)
R67_24 "11k" RESC1608X55N 3889.76,2589.14 r180 top (schematic designator R67)
R67_25 "11k" RESC1608X55N 2000,2953.32 r180 top (schematic designator R67)
R67_26 "11k" RESC1608X55N 2976.38,2854.89 r180 top (schematic designator R67)
R67_27 "11k" RESC1608X55N 3889.76,2864.73 r180 top (schematic designator R67)
R67_28 "11k" RESC1608X55N 2000,3228.91 r180 top (schematic designator R67)
R67_29 "11k" RESC1608X55N 2976.38,3130.48 r180 top (schematic designator R67)
R67_30 "11k" RESC1608X55N 3889.76,3140.32 r180 top (schematic designator R67)
R67_31 "11k" RESC1608X55N 2976.38,3406.07 r180 top (schematic designator R67)
R67_32 "11k" RESC1608X55N 3889.76,3415.91 r180 top (schematic designator R67)
R68_1 "Undefined" RESC1608X55N 2120,473 r180 top (schematic designator R68)
R68_2 "Undefined" RESC1608X55N 3096.38,374.57 r180 top (schematic designator R68)
R68_3 "Undefined" RESC1608X55N 2120,748.59 r180 top (schematic designator R68)
R68_4 "Undefined" RESC1608X55N 3096.38,650.16 r180 top (schematic designator R68)
R68_5 "Undefined" RESC1608X55N 2120,1024.18 r180 top (schematic designator R68)
R68_6 "Undefined" RESC1608X55N 3096.38,925.76 r180 top (schematic designator R68)
R68_7 "Undefined" RESC1608X55N 2120,1299.77 r180 top (schematic designator R68)
R68_8 "Undefined" RESC1608X55N 3096.38,1201.35 r180 top (schematic designator R68)
R68_9 "Undefined" RESC1608X55N 4009.76,1211.19 r180 top (schematic designator R68)
R68_10 "Undefined" RESC1608X55N 2120,1575.36 r180 top (schematic designator R68)
R68_11 "Undefined" RESC1608X55N 3096.38,1476.94 r180 top (schematic designator R68)
R68_12 "Undefined" RESC1608X55N 4009.76,1486.78 r180 top (schematic designator R68)
R68_13 "Undefined" RESC1608X55N 2120,1850.95 r180 top (schematic designator R68)
R68_14 "Undefined" RESC1608X55N 3096.38,1752.53 r180 top (schematic designator R68)
R68_15 "Undefined" RESC1608X55N 4009.76,1762.37 r180 top (schematic designator R68)
R68_16 "Undefined" RESC1608X55N 2120,2126.54 r180 top (schematic designator R68)
R68_17 "Undefined" RESC1608X55N 3096.38,2028.12 r180 top (schematic designator R68)
R68_18 "Undefined" RESC1608X55N 4009.76,2037.96 r180 top (schematic designator R68)
R68_19 "Undefined" RESC1608X55N 2120,2402.13 r180 top (schematic designator R68)
R68_20 "Undefined" RESC1608X55N 3096.38,2303.71 r180 top (schematic designator R68)
R68_21 "Undefined" RESC1608X55N 4009.76,2313.55 r180 top (schematic designator R68)
R68_22 "Undefined" RESC1608X55N 2120,2677.72 r180 top (schematic designator R68)
R68_23 "Undefined" RESC1608X55N 3096.38,2579.3 r180 top (schematic designator R68)
R68_24 "Undefined" RESC1608X55N 4009.76,2589.14 r180 top (schematic designator R68)
R68_25 "Undefined" RESC1608X55N 2120,2953.31 r180 top (schematic designator R68)
R68_26 "Undefined" RESC1608X55N 3096.38,2854.89 r180 top (schematic designator R68)
R68_27 "Undefined" RESC1608X55N 4009.76,2864.73 r180 top (schematic designator R68)
R68_28 "Undefined" RESC1608X55N 2120,3228.91 r180 top (schematic designator R68)
R68_29 "Undefined" RESC1608X55N 3096.38,3130.48 r180 top (schematic designator R68)
R68_30 "Undefined" RESC1608X55N 4009.76,3140.32 r180 top (schematic designator R68)
R68_31 "Undefined" RESC1608X55N 3096.38,3406.07 r180 top (schematic designator R68)
R68_32 "Undefined" RESC1608X55N 4009.76,3415.91 r180 top (schematic designator R68)
R69 "24k" RESC1608X55N 4557.16,1755.2 r270 top
R70 "2k7" RESC1608X55N 4557.72,1873.55 r270 top
R71 "0" RESC1005X40N 6181.1,314.96 r180 bottom
R72 "0" RESC1005X40N 6181.1,354.33 r180 bottom
R73 "1M1" RESC2012X60N 190.37,-2.08 r0 top
R74 "10M" RESC2113X55N 3312.99,-28.54 r180 bottom
R75 "10M" RESC2113X55N 6233.27,-61.02 r180 top
R76 "10k" RESC1005X40N 6507.6,561.73 r180 bottom
R77 "33" RESC1005X40N 270.67,1290.35 r0 bottom
R78 "33" RESC1005X40N 270.67,1327.76 r0 bottom
R79 "33" RESC1005X40N 270.67,1365.16 r0 bottom
R80 "33" RESC1005X40N 270.67,1402.56 r0 bottom
R81 "33" RESC1005X40N 270.67,1438.98 r0 bottom
R82 "220" RESC1608X55N 617.87,-59.52 r0 bottom
R83 "33" RESC1005X40N -42.52,1460.63 r0 bottom
R84 "10k" RESC1005X40N -87.6,2399.61 r90 bottom
R85 "33" RESC1005X40N -29.53,1986.22 r270 bottom
R86 "33" RESC1005X40N 17.72,1986.22 r270 bottom
R87 "33" RESC1005X40N 70.87,1986.22 r270 bottom
R88 "0" RESC1005X40N 5293.07,767.25 r0 top
R89 "33" RESC1005X40N 124.02,1986.42 r270 bottom
R90 "33" RESC1005X40N 122.05,2398.62 r90 bottom
R91 "240" RESC1005X40N 259.84,1625.98 r0 bottom
R92 "33" RESC1005X40N 84.65,2398.62 r90 bottom
R93 "33" RESC1005X40N 20.67,2400.59 r90 bottom
R94 "33" RESC1005X40N -31.5,2400.59 r90 bottom
R95 "100" RESC1005X40N 7574.8,2066.93 r90 top
R96 "100" RESC1005X40N 7535.43,2066.93 r270 top
R97 "0" RESC1005X40N 5240,1213 r0 top
R98 "100" RESC1005X40N 7401.57,2055.12 r180 top
R99 "0" RESC1005X40N 5240,1093 r0 top
R100 "0" RESC1005X40N 7692.91,2000 r270 top
R101 "0" RESC1005X40N 5240,1133 r0 top
R102 "100" RESC1005X40N 7496.06,2066.93 r270 top
R103 "100" RESC1005X40N 7307.09,1917.32 r270 top
R104 "0" RESC1005X40N 7712.6,1909.45 r180 top
R105 "100" RESC1005X40N 7511.81,1645.67 r90 top
R106 "100" RESC1005X40N 7307.09,1795.28 r270 top
R107 "0" RESC1005X40N 7712.6,1811.02 r180 top
R108 "100" RESC1005X40N 7291.34,1696.85 r0 top
R109 "100" RESC1005X40N 7401.57,1665.35 r0 top
R110 "0" RESC1005X40N 7712.6,1748.03 r180 top
R111 "100" RESC1005X40N 7531.5,1177.17 r90 top
R112 "100" RESC1005X40N 7263.78,1090.55 r0 top
R113 "220" RESC1608X55N 560,205 r90 bottom
R114 "220" RESC1608X55N 441.2,204.5 r90 bottom
R115 "220" RESC1608X55N 500.26,204.5 r90 bottom
R116 "220" RESC1608X55N 4403.31,696.39 r180 bottom
R117 "220" RESC1608X55N 4403.31,755.57 r180 bottom
R118 "220" RESC1608X55N 617.87,-0.46 r0 bottom
R119 "220" RESC1608X55N 323.09,92.3 r180 bottom
R120 "220" RESC1608X55N 323.09,37.18 r180 bottom
R121 "220" RESC1608X55N 323.09,66.71 r180 top
R122 "220" RESC1608X55N 323.09,7.65 r180 top
R123 "220" RESC1608X55N 323.09,-51.4 r180 top
R124 "100" RESC1005X40N 7377.95,1161.42 r180 top
R125 "0" RESC1005X40N 7692.91,1066.93 r180 top
R126 "100" RESC1005X40N 7492.13,1177.17 r270 top
R127 "100" RESC1005X40N 7279.53,1023.62 r270 top
R128 "0" RESC1005X40N 7692.91,1007.87 r180 top
R129 "100" RESC1005X40N 7259.84,956.69 r0 top
R130 "100" RESC1005X40N 7279.53,901.57 r270 top
R131 "0" RESC1005X40N 7692.91,913.39 r180 top
R132 "10k" RESC1005X40N 7507.87,748.03 r270 top
R133 "100" RESC1005X40N 7259.84,803.15 r0 top
R134 "100" RESC1005X40N 7374.02,763.78 r0 top
R135 "0" RESC1005X40N 7692.91,870.08 r180 top
R136 "0" RESC1005X40N 6885.83,1940.94 r180 top
R137 "0" RESC1005X40N 6885.83,1842.52 r180 top
R138 "0" RESC1005X40N 6885.83,1653.54 r180 top
R139 "0" RESC1005X40N 6886.3,1411.15 r180 top
R140 "0" RESC1005X40N 6885.83,1342.52 r180 top
R141 "100" RESC1005X40N 5364.46,1616.8 r180 top
R142 "0" RESC1005X40N 6885.83,1114.17 r180 top
R143 "0" RESC1005X40N 6885.83,1039.37 r180 top
R144 "100" RESC1005X40N 5288.46,1474.8 r270 top
R145 "0" RESC1005X40N 6885.83,933.07 r180 top
R146 "0" RESC1005X40N 6885.83,1901.57 r180 top
R147 "100" RESC1005X40N 5299.46,1355.8 r270 top
R148 "0" RESC1005X40N 6885.83,1803.15 r180 top
R149 "0" RESC1005X40N 6885.83,1614.17 r180 top
R150 "24k" RESC1608X55N 4572.45,1295.48 r90 top
R151 "100" RESC1005X40N 5388.46,1229.8 r0 top
R152 "0" RESC1005X40N 6886.3,1446.59 r180 top
R153 "2k7" RESC1608X55N 4572.45,1177.37 r90 top
R154 "0" RESC1005X40N 6886.3,1304.85 r180 top
R155 "0" RESC1005X40N 6885.83,1149.61 r180 top
R156 "0" RESC1005X40N 6885.83,1000 r180 top
R157 "100" RESC1005X40N 5585.46,679.8 r270 top
R158 "0" RESC1005X40N 6885.83,893.7 r180 top
R159 "0" RESC1005X40N 256.38,809.32 r180 bottom
R160 "100" RESC1005X40N 5401.55,1104.37 r180 top
R161 "0" RESC1005X40N 256.38,769.95 r180 bottom
R162 "270k" RESC1608X55N 4804.39,2382.65 r180 top
R163 "100" RESC1005X40N 5313.55,964.37 r270 top
R164 "82k" RESC1608X55N 4804.39,2441.71 r0 top
R165 "0" RESC1005X40N 256.38,730.58 r180 bottom
R166 "100" RESC1005X40N 5304.55,849.37 r270 top
R170 "100" RESC1005X40N 5402.55,716.37 r0 top
R171 "10k" RESC1005X40N 5591.15,1105.89 r0 top
R183 "0" RESC1005X40N 6520.65,130.83 r90 top
R185 "22" RESC1005X40N 6520.18,215.8 r270 top
R205 "22" RESC1005X40N 7474.53,271.69 r270 top
R220 "10k" RESC1005X40N 7156.64,457.49 r180 bottom
R221 "0" RESC1005X40N 6505.81,421.07 r0 bottom
R222 "2k7" RESC1608X55N 6735.55,368.56 r0 bottom
R223 "5k6" RESC1005X40N 6758.28,420.02 r0 bottom
R224 "10k" RESC1005X40N 7156.71,496.3 r180 bottom
R225 "10k" RESC1005X40N 7215.58,477.63 r270 bottom
R226 "1k6" RESC1005X40N 6683.66,420.26 r180 bottom
R227 "1k6" RESC1005X40N 6683.63,458.9 r180 bottom
R229 "10k" RESC1005X40N 6506.54,471.55 r180 bottom
R298 "240" RESC1005X40N 7435.37,271.69 r90 top
RT1 "10k" THERMC1608X90N 4144.07,282.53 r90 bottom
SCREW1 "2 -56 UNC" TYCO_786585-2 -234.59,716.37 r180 top locked
SCREW2 "2 -56 UNC" TYCO_786585-2 -235.28,3001.5 r180 top locked
T10 "BSS138LT1G" SOT95P240X110-3N 6618.11,173.23 r270 top
TEC1 "CP20147H" TEC_CP20147H 3865.21,501.5 r0 top
TP1 "Test Point" TPS127 5272.4,1636.48 r0 top
TP2 "Test Point" TPS127 5273.39,1721.98 r0 top
TP3 "Test Point" TPS127 5143.46,1164.89 r0 top
TP4 "Test Point" TPS127 5143.46,1251.5 r0 top
TP5 "Test Point" TPS127 3533.23,86.15 r0 top
TP6 "Test Point" TPS127 5347.9,303.75 r0 top
TP7 "Test Point" TPS127 5143.81,1335.49 r0 top
TP8 "Test Point" TPS127 4525.35,1438.57 r0 top
TP9 "Test Point" TPS127 4531.56,1625.21 r0 top
TP10 "Test Point" TPS127 5276.34,564.5 r90 top
TP11 "Test Point" TPS127 5584.41,302.69 r90 top
TP12 "Test Point" TPS127 5584.41,212.13 r90 top
TP13 "Test Point" TPS127 5373.78,415.87 r90 top
TP14 "Test Point" TPS127 5577.52,577.29 r90 top
TP15 "Test Point" TPS127 5275.35,706.23 r90 top
TP16 "Test Point" TPS127 5392.28,1791.07 r90 top
TP17 "Test Point" TPS127 5141.5,1070.4 r90 top
TP18 "Test Point" TPS127 4584.41,373.55 r90 top
TP19 "Test Point" TPS127 8114.17,602.36 r90 top
TP20 "Test Point" TPS127 7988.19,602.36 r90 top
TP21 "Test Point" TPS127 7787.4,1106.3 r180 top

## Footprints (in the part's own frame and the unit in brackets; to place one, negate y for a bottom-side part, rotate by r counter-clockwise, add the part's x,y. Pads: shape width x height; smd on the part's side, far side on the other; paste and mask are expansions set on the pad)
3M_N2510-6002RB [mm] "10 Contacts - Straight .100\" x .100\" Low Profile Four-Wall Header"
  round 1.7 hole 1: 1(-5.08,-1.27) 2(-5.08,1.27) 3(-2.54,-1.27) 4(-2.54,1.27) 5(0,-1.27) 6(0,1.27) 7(2.54,-1.27) 8(2.54,1.27) 9(5.08,-1.27) 10(5.08,1.27)
  silkscreen extent -10.01,-4.85 10.01,4.52, body extent -10.01,-4.11 10.01,4.52, height 9.91
3M_N2526-6002RB [mm] "26 Contacts - Straight .100\" x .100\" Low Profile Four-Wall Header"
  round 1.6 hole 1: 1(-15.24,-1.27) 2(-15.24,1.27) 3(-12.7,-1.27) 4(-12.7,1.27) 5(-10.16,-1.27) 6(-10.16,1.27) 7(-7.62,-1.27) 8(-7.62,1.27) 9(-5.08,-1.27) 10(-5.08,1.27) 11(-2.54,-1.27) 12(-2.54,1.27) 13(0,-1.27) 14(0,1.27) 15(2.54,-1.27) 16(2.54,1.27) 17(5.08,-1.27) 18(5.08,1.27) 19(7.62,-1.27) 20(7.62,1.27) 21(10.16,-1.27) 22(10.16,1.27) 23(12.7,-1.27) 24(12.7,1.27) 25(15.24,-1.27) 26(15.24,1.27)
  silkscreen extent -20.17,-4.85 20.17,4.52, body extent -20.17,-4.11 20.17,4.52, height 9.91
3M_N2530-6002RB#1 [mm] "30 Contacts - Straight .100\" x .100\" Low Profile Four-Wall Header"
  round 1.7 hole 1: 1(-17.78,-1.27) 2(-17.78,1.27) 3(-15.24,-1.27) 4(-15.24,1.27) 5(-12.7,-1.27) 6(-12.7,1.27) 7(-10.16,-1.27) 8(-10.16,1.27) 9(-7.62,-1.27) 10(-7.62,1.27) 11(-5.08,-1.27) 12(-5.08,1.27) 13(-2.54,-1.27) 14(-2.54,1.27) 15(0,-1.27) 16(0,1.27) 17(2.54,-1.27) 18(2.54,1.27) 19(5.08,-1.27) 20(5.08,1.27) 21(7.62,-1.27) 22(7.62,1.27) 23(10.16,-1.27) 24(10.16,1.27) 25(12.7,-1.27) 26(12.7,1.27) 27(15.24,-1.27) 28(15.24,1.27) 29(17.78,-1.27) 30(17.78,1.27)
  silkscreen extent -22.71,-4.85 22.71,4.52, body extent -22.71,-4.11 22.71,4.52, height 9.91
3M_N2530-6002RB#2 [mm] "30 Contacts - Straight .100\" x .100\" Low Profile Four-Wall Header"
  round 1.6 hole 1: 1(-17.78,-1.27) 2(-17.78,1.27) 3(-15.24,-1.27) 4(-15.24,1.27) 5(-12.7,-1.27) 6(-12.7,1.27) 7(-10.16,-1.27) 8(-10.16,1.27) 9(-7.62,-1.27) 10(-7.62,1.27) 11(-5.08,-1.27) 12(-5.08,1.27) 13(-2.54,-1.27) 14(-2.54,1.27) 15(0,-1.27) 16(0,1.27) 17(2.54,-1.27) 18(2.54,1.27) 19(5.08,-1.27) 20(5.08,1.27) 21(7.62,-1.27) 22(7.62,1.27) 23(10.16,-1.27) 24(10.16,1.27) 25(12.7,-1.27) 26(12.7,1.27) 27(15.24,-1.27) 28(15.24,1.27) 29(17.78,-1.27) 30(17.78,1.27)
  silkscreen extent -22.71,-4.85 22.71,4.52, body extent -22.71,-4.11 22.71,4.52, height 9.91
AMPHENOL_10052825-101LF [mm] "72 Contacts, 2mm Pitch, 6 Columns, 4 Pairs per Column, 4 Walls, Right Angle Header"
  round 1.1 hole 0.5: A1(-5,-7.65) A2(-3,-7.75) A3(-1,-7.65) A4(1,-7.75) A5(3,-7.65) A6(5,-7.75) B1(-5,-6.25) B2(-3,-6.35) B3(-1,-6.25) B4(1,-6.35) B5(3,-6.25) B6(5,-6.35) C1(-5,-4.85) C2(-3,-4.95) C3(-1,-4.85) C4(1,-4.95) C5(3,-4.85) C6(5,-4.95) D1(-5,-3.45) D2(-3,-3.55) D3(-1,-3.45) D4(1,-3.55) D5(3,-3.45) D6(5,-3.55) E1(-5,-2.05) E2(-3,-2.15) E3(-1,-2.05) E4(1,-2.15) E5(3,-2.05) E6(5,-2.15) F1(-5,-0.65) F2(-3,-0.75) F3(-1,-0.65) F4(1,-0.75) F5(3,-0.65) F6(5,-0.75) G1(-5,0.75) G2(-3,0.65) G3(-1,0.75) G4(1,0.65) G5(3,0.75) G6(5,0.65) H1(-5,2.15) H2(-3,2.05) H3(-1,2.15) H4(1,2.05) H5(3,2.15) H6(5,2.05) I1(-5,3.55) I2(-3,3.45) I3(-1,3.55) I4(1,3.45) I5(3,3.55) I6(5,3.45) J1(-5,4.95) J2(-3,4.85) J3(-1,4.95) J4(1,4.85) J5(3,4.95) J6(5,4.85) K1(-5,6.35) K2(-3,6.25) K3(-1,6.35) K4(1,6.25) K5(3,6.35) K6(5,6.25) L1(-5,7.75) L2(-3,7.65) L3(-1,7.75) L4(1,7.65) L5(3,7.75) L6(5,7.65)
  silkscreen extent -6.95,-21.95 6.95,11.85, body extent -6.95,-21.95 6.95,11.85, height 15.25
AMPHENOL_10052838-101LF [mm] "96 Contacts, 2mm Pitch, 8 Columns, 4 Pairs per Column, 4 Walls, Right Angle Header"
  round 1.1 hole 0.5: A1(-7,-7.65) A2(-5,-7.75) A3(-3,-7.65) A4(-1,-7.75) A5(1,-7.65) A6(3,-7.75) A7(5,-7.65) A8(7,-7.75) B1(-7,-6.25) B2(-5,-6.35) B3(-3,-6.25) B4(-1,-6.35) B5(1,-6.25) B6(3,-6.35) B7(5,-6.25) B8(7,-6.35) C1(-7,-4.85) C2(-5,-4.95) C3(-3,-4.85) C4(-1,-4.95) C5(1,-4.85) C6(3,-4.95) C7(5,-4.85) C8(7,-4.95) D1(-7,-3.45) D2(-5,-3.55) D3(-3,-3.45) D4(-1,-3.55) D5(1,-3.45) D6(3,-3.55) D7(5,-3.45) D8(7,-3.55) E1(-7,-2.05) E2(-5,-2.15) E3(-3,-2.05) E4(-1,-2.15) E5(1,-2.05) E6(3,-2.15) E7(5,-2.05) E8(7,-2.15) F1(-7,-0.65) F2(-5,-0.75) F3(-3,-0.65) F4(-1,-0.75) F5(1,-0.65) F6(3,-0.75) F7(5,-0.65) F8(7,-0.75) G1(-7,0.75) G2(-5,0.65) G3(-3,0.75) G4(-1,0.65) G5(1,0.75) G6(3,0.65) G7(5,0.75) G8(7,0.65) H1(-7,2.15) H2(-5,2.05) H3(-3,2.15) H4(-1,2.05) H5(1,2.15) H6(3,2.05) H7(5,2.15) H8(7,2.05) I1(-7,3.55) I2(-5,3.45) I3(-3,3.55) I4(-1,3.45) I5(1,3.55) I6(3,3.45) I7(5,3.55) I8(7,3.45) J1(-7,4.95) J2(-5,4.85) J3(-3,4.95) J4(-1,4.85) J5(1,4.95) J6(3,4.85) J7(5,4.95) J8(7,4.85) K1(-7,6.35) K2(-5,6.25) K3(-3,6.35) K4(-1,6.25) K5(1,6.35) K6(3,6.25) K7(5,6.35) K8(7,6.25) L1(-7,7.75) L2(-5,7.65) L3(-3,7.75) L4(-1,7.65) L5(1,7.75) L6(3,7.65) L7(5,7.75) L8(7,7.65)
  silkscreen extent -8.95,-21.95 8.95,11.85, body extent -8.95,-21.95 8.95,11.85, height 15.25
c130h80 [mm] "Plated Through Hole: Hole Dia.=0.8mm Pad Dia.=1.30mm, , IPC-7251 Level C"
  round 1.3 hole 0.8: 1(0,0)
  silkscreen extent -1,-1 1,1
c160h110 [mm] "Plated Through Hole: Hole Dia.=1.1mm Pad Dia.=1.6mm, IPC-7251 Level C"
  round 1.6 hole 1.1: 1(0,0)
  silkscreen extent -1.15,-1.15 1.15,1.15
CAPC1005X55N [mm] "Chip Capacitor, Body 1.0x0.55mm, IPC Medium Density"
  rect 0.62x0.62 smd: 1(-0.45,0) 2(0.45,0)
  body extent -0.52,-0.27 0.53,0.28, height 0.55
CAPC1608X80N [mm] "Chip Capacitor, Body 1.6x0.8mm IPC Medium Density"
  rect 1x1 smd: 1(-0.75,0) 2(0.75,0)
  body extent -0.87,-0.47 0.88,0.48, height 0.8
CAPC1608X87N [mm] "Chip Capacitor, Body 1.6x0.8mm IPC Medium Density"
  rect 0.95x1 smd: 1(-0.8,0) 2(0.8,0)
  body extent -0.87,-0.47 0.88,0.48, height 0.87
CAPC1608X90N [mm] "Chip Capacitor, Body 1.6x0.8mm IPC Medium Density"
  rect 0.95x0.95 smd: 1(-0.75,0) 2(0.75,0)
  body extent -0.85,-0.45 0.85,0.45, height 0.9
CAPC2012X135N [mm] "Chip Capacitor, Body 2.0x1.25mm, IPC Medium Density"
  rect 1.05x1.4 smd: 1(-0.9,0) 2(0.9,0)
  silkscreen extent 0,-0.58 0,0.58, body extent -1.05,-0.67 1.05,0.68, height 1.25
CAPC3216X140N [mm] "Chip Capacitor, Body 3.2x1.6mm, IPC Medium Density"
  rect 1.15x1.8 smd: 1(-1.5,0) 2(1.5,0)
  silkscreen extent -0.5,-0.9 0.5,0.9, body extent -1.7,-0.9 1.7,0.9, height 1.4
CAPMP3216X180N [mm] "Capacitor, Polarized, Molded  Body 3.2x1.6mm, IPC Medium Density"
  rect 1.8x1.25 smd: 1(-1.3,0) 2(1.3,0)
  silkscreen extent -2.4,-0.7 0,1.2, body extent -1.7,-0.9 1.7,0.9, height 1.6
CC6-1212DF-E [mm]
  round 2 hole 1: 1(-2.54,-2.63) 2(-2.54,-12.79) 3(-2.54,-17.87) 4(20.32,-17.87) 5(20.32,-12.79) 6(20.32,-7.71) 7(20.32,-2.63)
  round 2.5 hole 1.5: 8(0,0) 9(17.78,-20.5)
  silkscreen extent -4.06,-20.83 20.44,0.25, body extent -2.72,-20.81 20.44,0.29, height 8.4
CLIP_HOLLAND-SHIELDING_LC [mm] "Surface Mount Clip for PCB Screening Covers"
  rect 9.4x2.3 smd: 1(0,0)
  silkscreen extent -4.7,-1.5 4.7,1.5, body extent -4.4,-1.15 4.4,1.15, height 3.5
DCDC_XPPOWER_JHM0X [mm] "JHM Series , Body 31.75 x 20.32mm"
  round 1.5 hole 0.8: 2(-11.555,-7.62) 3(-9.015,-7.62) 9(6.225,-7.62) 10(8.765,-7.62) 11(11.305,-7.62) 14(11.305,7.62) 16(6.225,7.62) 22(-9.015,7.62) 23(-11.555,7.62)
  silkscreen extent -15.88,-11.01 15.88,10.16, body extent -15.88,-10.16 15.88,10.16, height 10.4
DIOM5126X265N [mm] "DO-214-AC/SMA Molded Diode, 2-Leads, Body 5.1x2.6mm, IPC Medium Density"
  rect 2.2x1.55 smd: 1(-2.05,0) 2(2.05,0)
  silkscreen extent -3.48,-1.45 2.7,1.47, body extent -2.67,-1.45 2.68,1.45, height 2.65
FIDUCIAL_TOP_C100-200 [mm] "Round Fiducial Target, Top Layer, 1.0mm, Top Solder 2.0mm, Keepout =2.0mm"
  round 1 smd paste-0.51 mask+0.5: FTG2(0,0)
  TopLayer keep-out circle w0.1: c0,0 r1
FIDUCIAL_TOP_S100-200 [mm] "Square Fiducial Target, Top Layer, 1.0mm, Top Solder 2.0mm, Keepout =2.0mm"
  rect 1x1 smd rot 45 paste-0.51 mask+0.5: 1(0,0)
  TopLayer keep-out region: 1.414,0 0,-1.414 -1.414,0 0,1.414
HSINK_ATS_ATS-56001-C3-R0 [mil]
  silkscreen extent -359,-462 359,463, body extent -516,-376 520,372, height 472
IND_MURATA-PS_8400 [mm] "Miniature Surface Mount Power Inductors, 4.5mm L X 3.3mm W X 2.9mm H, MURATA 8400 Series"
  rect 2x3.5 smd: 1(-1.6,0) 2(1.6,0)
  silkscreen extent -0.3,-1.8 0.3,1.8, body extent -2.4,-1.8 2.4,1.8, height 2.9
IND_WURTH_WE-SL2 [mm] "Common Mode SMD Line Filter WE-SL2"
  rect 2x1.2 smd: 1(-3.75,1.27) 2(-3.75,-1.27) 3(3.75,-1.27) 4(3.75,1.27)
  silkscreen extent -4.75,-3.15 4.75,3.15, body extent -4.75,-3.15 4.75,3.15, height 5.3
IND_WURTH_WE-TPC_4828 [mm] "Shielded Tiny Power Inductor, Body 4.8x4.8mm"
  rect 0.95x5.3 smd: 1(-2.275,0) 2(2.275,0)
  rect 1.05x1.014 smd: 1(-1.275,2.143) 1(-1.275,-2.143) 2(1.275,-2.143) 2(1.275,2.143)
  TopLayer region: 2.75,-2.65 0.75,-2.65 0.75,-1.636 1.394,-1.138 1.753,-0.407 1.753,0.407 1.394,1.138 0.75,1.636 0.75,1.636 0.75,2.65 2.75,2.65
  TopLayer region: -2.75,-2.65 -0.75,-2.65 -0.75,-1.636 -1.394,-1.138 -1.753,-0.407 -1.753,0.407 -1.394,1.138 -0.75,1.636 -0.75,1.636 -0.75,2.65 -2.75,2.65
  TopLayer region: 0.75,-2.65 2.75,-2.65 2.75,2.65 0.75,2.65 0.75,1.636 1.394,1.138 1.753,0.407 1.753,-0.407 1.394,-1.138 0.75,-1.636 0.75,-1.636
  silkscreen extent -0.35,-2.4 0.35,2.4, body extent -2.4,-2.4 2.4,2.4, height 2.8
LED_AVAGO_HSME-C120 [mm] "Green Chip LED, 2-Leads, Body 1.7x1.1mm, Side Emitting Package"
  rect 0.8x0.7 smd: 1(-1,0) 2(1,0)
  rect 0.4x0.4 smd: 3(0,-0.35)
  silkscreen extent -1.12,-0.92 0.42,0.8, body extent -0.85,-0.3 0.85,0.8, height 0.7